# Altium PCB Sampler_DIOT.PCBDOC (part 4 of 11)
Units mm, origin at the board's own origin, x right, y up, seen from the top; angles counter-clockwise.
Board outline 222.9 x 100 mm, 4 copper layers (L1, P2, L3, L4), stack 1.6 mm thick; 754 components, 442 nets, 2347 pads, 1230 vias.
Unrouted connection lines stored in the file: 10.
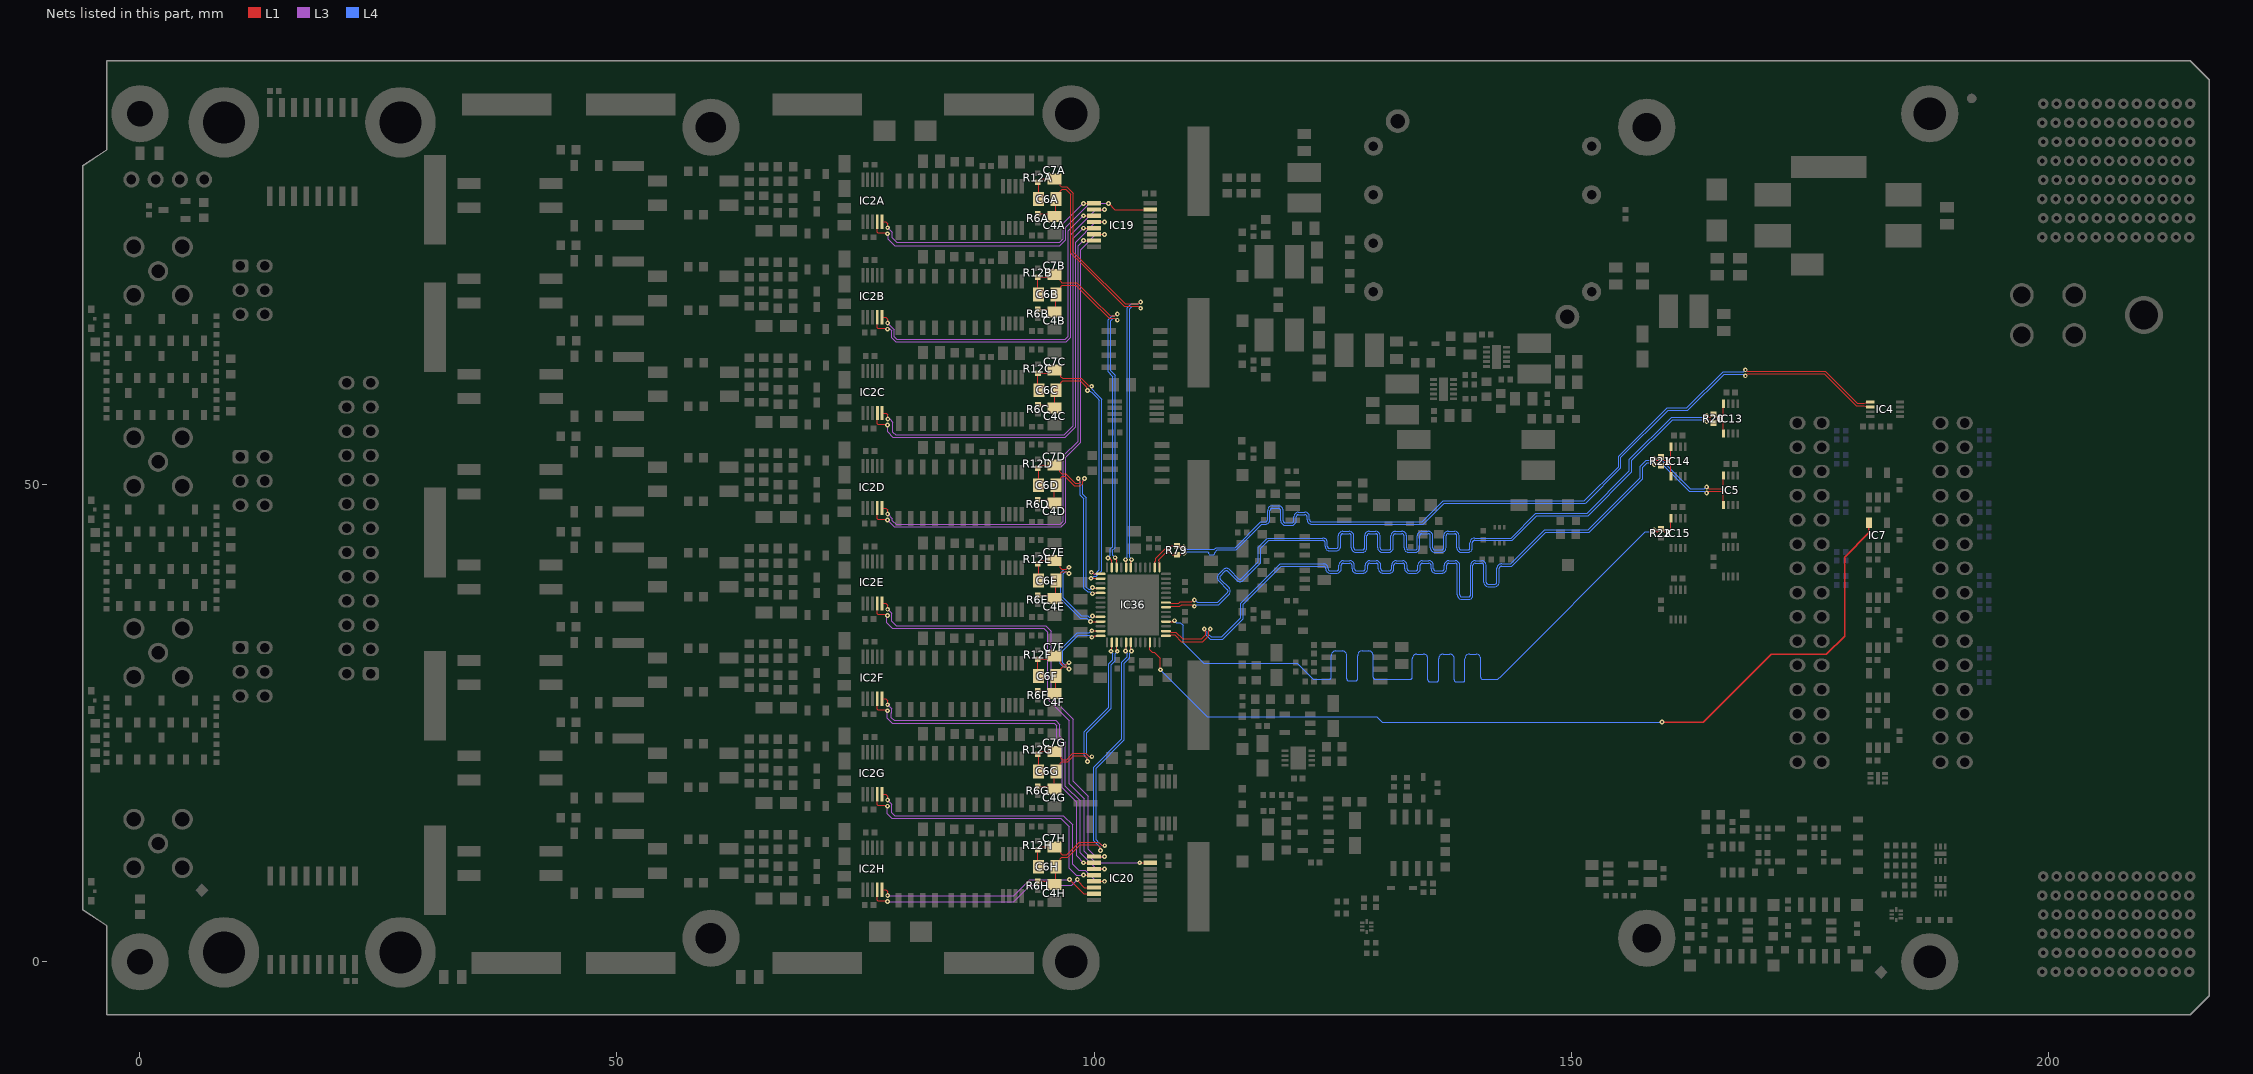
[diagram p5: the nets of this part, all layers, seen from the top]

## Part data (continued)
T_D6: "Schottky Diode", Case=SOD-523F, Manufacturer=COMCHIP, Power=500mA, Voltage=20V, Author="CERN DEM HF", Bonding=No, Component Type=Standard, ComponentHeight=1mm, CreateDate=13.10.2023, Device=CDBU0520-HF, HelpURL=\\cern.ch\dfs\Applications\Altium\Datasheets\CDBU0520-HF.pdf, LatestRevisionDate=13.10.2023, Manufacturer Part Number=CDBU0520-HF, Mounted=Yes, PackageDescription="Small Outline Diode Flat Lead (SOD-523F), Body; 1.80mm L X 1mm W X 0.85mm H", Part Description="20V Surface mount Schottky Barrier Diode", Part Number=CDBU0520-HF, Pin Count=2, PressFit=No, Sense=No, SMD=Yes, Socket=No
T_FL1: library part FIL_MURATA_BNX022-01L, "Block Type EMIFIL (LC Combined)", Manufacturer=MURATA, Manufacturer Part Number=BNX022-01L, Resistance=0.5R, Author="CERN DEM JLC", Component Type=Standard, ComponentHeight=3.3mm, CreateDate=10.10.2012, HelpURL=\\cern.ch\dfs\Applications\Altium\Datasheets\FIL_MURATA_BNX022-01L.pdf, LatestRevisionDate=10.10.2012, Mounted=Yes, Part Description="Block Type EMIFIL (LC Combined) SMD Type, BNX02* Series", Part Number=FIL_MURATA_BNX022-01L, Pin Count=2, Sense=No, SMD=Yes, Socket=No, Status=None
T_IC1: "500mA Peak Output LDO Regulator", Case=SOT23-5, Manufacturer="MICROCHIP TECHNOLOGY", Author="CERN DEM WB", Bonding=No, Component Type=Standard, ComponentHeight=1.45mm, CreateDate=2019-04-16, Device=MIC5219-3.3YM5, HelpURL=\\cern.ch\dfs\Applications\Altium\Datasheets\MIC5219-3.3YM5.pdf, LatestRevisionDate=2019-04-16, Manufacturer Part Number=MIC5219-3.3YM5, Mounted=Yes, PackageDescription="SOT, 0.95mm pitch; 5 pin, 1.60mm W X 2.90mm L X 1.45mm H body, IPC Medium Density", Part Description="3.3V 500mA Peak Output Low Drop-Out  (LDO) Regulator", Part Number=MIC5219-3.3YM5, Pin Count=5, PressFit=No, Sense=No, SMD=Yes, Socket=No
T_IC2 T_IC4: "1.7V-5.5V, 2K I2C Serial EEPROM With EUI-48 Node Identity", Case=SOT23-5, Manufacturer="MICROCHIP TECHNOLOGY", Author="CERN DEM MR", Bonding=No, Component Type=Standard, ComponentHeight=1.45mm, CreateDate=31.03.2016, Device=24AA02E48T-I/OT, HelpURL=\\cern.ch\dfs\Applications\Altium\Datasheets\24AA02E48T-I-OT.pdf, LatestRevisionDate=31.03.2016, Manufacturer Part Number=24AA02E48T-I/OT, Mounted=Yes, PackageDescription="SOT, 0.95mm pitch; 5 pin, 1.60mm W X 2.90mm L X 1.45mm H body, IPC Medium Density", Part Description="1.7V-5.5V, 2K I2C Serial EEPROM with EUI-48 Node Identity", Part Number=24AA02E48T-I/OT, Pin Count=5, PressFit=No, Sense=No, SMD=Yes, Socket=No
T_IC3 T_IC5: "1.7V-5.5V, 2K I2C™ Serial EEPROMs with EUI-48™ Node Identity", Case=SOIC8, Manufacturer="MICROCHIP TECHNOLOGY", Author="CERN DEM MR", Bonding=No, Component Type=Standard, ComponentHeight=1.75mm, CreateDate=19.07.2016, Device=24AA025E48-I/SN, HelpURL=\\cern.ch\dfs\Applications\Altium\Datasheets\24AA025E48-I-SN.pdf, LatestRevisionDate=19.07.2016, Manufacturer Part Number=24AA025E48-I/SN, Mounted=Yes, PackageDescription="SOIC 8, Pitch 1.27mm - Body 4x5mm, IPC Medium Density", Part Description="1.7V-5.5V, 2K I2C™ Serial EEPROMs with EUI-48™ Node Identity", Part Number=24AA025E48-I/SN, Pin Count=8, PressFit=No, Sense=No, SMD=Yes, Socket=No
T_IC6: library part CMP-010-00651-1, "Automotive, ±0.4°C accurate I²C temperature sensor with alert option 6-SOT-5X3 -40 to 125", Manufacturer="Texas Instruments", Manufacturer Part Number=TMP112DQDRLRQ1, Pins=6
T_IC7: "Low Quiescent Current, Programmable-Delay Supervisory Circuit", Case=SOT23-6, Manufacturer="TEXAS INSTRUMENTS", Manufacturer Part Number=TPS3808G01DBV, Author="CERN DEM JLC", Bonding=No, Component Type=Standard, ComponentHeight=1.45mm, CreateDate=22.10.2008, Device=TPS3808G01DBVT, HelpURL=\\cern.ch\dfs\Applications\Altium\Datasheets\TPS3808G01DBVT.pdf, LatestRevisionDate=10.06.2022, Mounted=Yes, PackageDescription="SOT, 0.95mm Pitch; 6 Pin, 1.60mm W X 2.90mm L X 1.45mm H body, IPC Medium Density", Part Description="Adjustable Low Quiescent Current, Programmable-Delay Supervisory Circuit", Part Number=TPS3808G01DBVT, Pin Count=6, PressFit=No, Sense=No, SMD=Yes, Socket=No
T_IC8 T_IC9: library part CMP-015-00014-1, "Dual Supply 2-Bit Voltage Translator/Buffer/Repeater Isolator for I2C Applications", Manufacturer=Onsemi, Max Operating Temperature=85°C, Max Supply Voltage=5.5V, Min Operating Temperature=-40°C, Min Supply Voltage=1.65V, Manufacaturer Part Number=FXMA2102UMX, Mounting Technology="Surface Mount", Pins=8
T_J1 T_J2: library part 3M_N2530-6002RB, "Connector 30 Male", Manufacturer=3M, Manufacturer Part Number=N2530-6002RB, Author="CERN DEM JLC", ComponentHeight=10.03mm, Component Type=Standard, CreateDate=11.02.2009, Family="Header 30", HelpURL=\\cern.ch\dfs\Applications\Altium\Datasheets\3M_N2530-6002RB.pdf, LatestRevisionDate=11.08.2009, Mounted=Yes, Part Description="30 Contacts - Straight .100'' x .100'' Low Profile Four-Wall Header, 2500 Series", Part Number=3M_N2530-6002RB, Pin Count=30, PressFit=No, Sense=No, SMD=No, Socket=No, Status=None
T_J4: library part AMPHENOL_10052825-101LF, "72 Contacts Header, 6 Columns, 4 Pairs per Column", Manufacturer=AMPHENOL, Manufacturer Part Number=10052825-101LF, Author="CERN DEM MR", ClassName=Overlapping, Component Type=Standard, ComponentHeight=15.35mm, ComponentLink1Description=Application, ComponentLink1URL=\\cern.ch\dfs\Applications\Altium\Datasheets\AMPHENOL_10052825-101LF_Application.pdf, CreateDate=19/02/2018, Family="AirMax VS", HelpURL=\\cern.ch\dfs\Applications\Altium\Datasheets\AMPHENOL_10052825-101LF.pdf, LatestRevisionDate=19/02/2018, Mounted=Yes, Part Description="72 Contacts, 2mm Pitch, 6 Columns, 4 Pairs per Column, 4 Walls, Right Angle Header", Part Number=AMPHENOL_10052825-101LF, Pin Count=72, PressFit=Yes, Sense=No, SMD=No, Socket=No, Status=None
T_J5: library part AMPHENOL_10052838-101LF, "96 Contacts Header, 8 Columns, 4 Pairs per Column", Manufacturer=AMPHENOL, Manufacturer Part Number=10052838-101LF, Author="CERN DEM MR", Component Type=Standard, ComponentHeight=15.35mm, ComponentLink1Description=Application, ComponentLink1URL=\\cern.ch\dfs\Applications\Altium\Datasheets\AMPHENOL_10052838-101LF_Application.pdf, CreateDate=19.02.2018, Family="AirMax VS", HelpURL=\\cern.ch\dfs\Applications\Altium\Datasheets\AMPHENOL_10052838-101LF.pdf, LatestRevisionDate=19.02.2018, Mounted=Yes, Part Description="96 Contacts, 2mm Pitch, 8 Columns, 4 Pairs per Column, 4 Walls, Right Angle Header", Part Number=AMPHENOL_10052838-101LF, Pin Count=96, PressFit=Yes, Sense=No, SMD=No, Socket=No, Status=None
T_J6: library part MOLEX_39-30-0040, "Connector 4 Male", Manufacturer=MOLEX, Manufacturer Part Number=39-30-0040, Author="CERN DEM JLC", Component Type=Standard, ComponentHeight=11.4mm, CreateDate=2018-10-02, Family="Mini-Fit Jr.™", HelpURL=\\cern.ch\dfs\Applications\Altium\Datasheets\MOLEX_39-30-0040.pdf, LatestRevisionDate=2018-10-02, Mounted=Yes, Part Description="4.20mm (.165\") Pitch Mini-Fit Jr. Header, Dual Row, Right Angle with Snap-in Plastic Peg PCB Lock, 4 Circuits", Part Number=MOLEX_39-30-0040, Pin Count=4, PressFit=No, Sense=No, SMD=No, Socket=No, Status=None
T_M1 T_M2 T_M3 T_M4: library part CMP-00028-00019-2, "PTH  Hole 3.4, 6mm pad", Pins=1
T_R13 T_R14 T_R15 T_R16 T_R17 T_R18: library part R0402_22R_1%_0.0625W_100PPM, "Resistor - 1%", Case=0402, Manufacturer=GENERIC, Manufacturer1 ComponentHeight=0.4mm, Manufacturer1 Example="YAGEO PHYCOMP", Manufacturer1 Part Number=232270672209L, Power=0.0625W, Tolerance=±1%, Author="CERN DEM JLC", Component Type=Standard, CreateDate=03.12.2007, HelpURL=\\cern.ch\dfs\Applications\Altium\Datasheets\R0402_Phycomp_RC0402.pdf, LatestRevisionDate=17.10.2012, Manufacturer Part Number=R0402_22R_1%_0.0625W_100PPM, Mounted=Yes, Part Description="General Purpose Thick Film Chip Resistor", Part Number=R0402_22R_1%_0.0625W_100PPM, Pin Count=2, PressFit=No, Sense=No, SMD=Yes, Socket=No, Status="Not Recommended"
T_R19: library part R0402_200R_1%_0.0625W_100PPM, "Resistor - 1%", Case=0402, Manufacturer=GENERIC, Manufacturer1 ComponentHeight=0.4mm, Manufacturer1 Example="YAGEO PHYCOMP", Manufacturer1 Part Number=232270672001L, Power=0.0625W, Tolerance=±1%, Author="CERN DEM JLC", Component Type=Standard, CreateDate=2007-12-03, HelpURL=\\cern.ch\dfs\Applications\Altium\Datasheets\R0402_Phycomp_RC0402.pdf, LatestRevisionDate=2012-10-17, Manufacturer Part Number=R0402_200R_1%_0.0625W_100PPM, Mounted=Yes, Part Description="General Purpose Thick Film Chip Resistor", Part Number=R0402_200R_1%_0.0625W_100PPM, Pin Count=2, PressFit=No, Sense=No, SMD=Yes, Socket=No, Status="Not Recommended", TC=±100ppm/°C
T_R26: library part R0805_1M1_1%_0.125W_100PPM, "Resistor - 1%", Case=0805, Manufacturer=GENERIC, Manufacturer1 ComponentHeight=0.6mm, Manufacturer1 Example="NIC COMPONENT", Manufacturer1 Part Number=NRC10F1104TRF, Author="CERN DEM JLC", Component Type=Standard, CreateDate=03/12/2007, HelpURL=\\cern.ch\dfs\Applications\Altium\Datasheets\R0805_NIC_NRC.pdf, LatestRevisionDate=13/03/2008, Manufacturer Part Number=R0805_1M1_1%_0.125W_100PPM, Mounted=Yes, Part Description="General Purpose Thick Film Chip Resistor", Part Number=R0805_1M1_1%_0.125W_100PPM, Pin Count=2, PressFit=No, Sense=No, SMD=Yes, Socket=No, Status=Preferred
T_R27 T_R28: library part "R0805_10M_1%_0.125W_100PPM_VISHAY_CRCW e3", "Resistor - 1%", Case=0805, Manufacturer="VISHAY DALE", Manufacturer Part Number=CRCW080510M0FKEA, Power=0.125W, Tolerance=±1%, Author="CERN DEM BC", Component Type=Standard, ComponentHeight=0.5mm, CreateDate=2019-11-12, HelpURL="\\cern.ch\dfs\Applications\Altium\Datasheets\R0805_VISHAY_CRCW e3.pdf", LatestRevisionDate=2019-11-12, Mounted=Yes, Part Description="150V, Standard Thick Film Chip Resistor", Part Number="R0805_10M_1%_0.125W_100PPM_VISHAY_CRCW e3", Pin Count=2, PressFit=No, Sense=No, SMD=Yes, Socket=No, Status=None, TC=±100ppm/°C
TP1 TP2 TP3 TP4 TP5 TP6 TP7 TP8 TP9 TP10 TP11 TP12 TP13 TP14 TP15 TP16 TP17 TP18 TP19 TP20: library part SMD_PAD_1.27X1.27MM, Author="CERN DEM JLC", ComponentHeight=0mm, Component Type="Standard (No BOM)", CreateDate=12.01.2008, Family="Test Point", HelpURL=Undefined, LatestRevisionDate=12.01.2008, Mounted=No, PackageDescription="1.27mm x 1.27mm PCB Copper Area (SMD Test Point)", Part Description="1.27mm x 1.27mm PCB Copper Area (SMD Test Point)", Part Number=SMD_PAD_1.27X1.27MM, Pin Count=1, Sense=No, SMD=Yes, Socket=No, Status=None
WASHER5 WASHER6 WASHER7 WASHER8: library part Keystone_7687, "SMA_Shoulder Washer", Author=GK, Component Type=Mechanical, ComponentHeight=1.91mm, CreateDate=28.01.2016, HelpURL=\\cern.ch\dfs\Applications\Altium\Datasheets\AAVID-THERMALLOY_7721-7PPSG.pdf, LatestRevisionDate=28.01.2016, Manufacturer="Custom 3D printed", Manufacturer Part Number="Custom 3D printed", Mounted=Yes, PackageDescription="Polyphenylene Sulfide PPS Shoulder Washer", Part Description="Polyphenylene Sulfide PPS Shoulder Washer", Part Number="Custom 3D printed", Pin Count=0, PressFit=No, Sense=No, SMD=No, Socket=No, Status=None

## Free pads (board coordinates)
  round 6 / inner round 4.5 / far side round 6 hole 3.2: MH(59.844,2.48) MH(59.844,87.48)

## Via types
v1: diameter 0.5, hole 0.2, L1 to L4, tented both sides, 1208 vias
v2: diameter 1, hole 0.6, L1 to L4, tented both sides, 16 vias
v3: diameter 0.6, hole 0.3, L1 to L4, tented both sides, 6 vias

## Nets (pads, with @x,y where several pads share a name; then routed paths per layer and width w, separated by ;. In a path a pad name is that pad's centre, name@x,y a point inside that pad or via, vN(x,y) a via of type N, cw(c..) or ccw(c..) an arc to the next point about the centre after c; other vN are vias at no path point)
A00: IC2A.4 IC19.15 | length 33.7
  L1 w0.127: IC2A.4@77.275,77.567 77.275,76.458 77.325,76.408 78.254,76.408 v1(78.35,76.312) ; v1(101.525,79.5) 102.175,78.85 IC19.15@105.899,78.85
  L3 w0.127: v1(78.35,76.312) 78.434,76.397 78.434,75.73 79.118,75.045 96.393,75.045 97.044,75.697 97.044,76.993 99.55,79.5 v1(101.525,79.5)
A01: IC2B.4 IC19.2 | length 39.2
  L1 w0.127: IC2B.4@77.275,67.567 77.275,66.458 77.325,66.408 78.254,66.408 v1(78.35,66.312) ; IC19.2@99.999,78.85 v1(101.101,78.85)
  L3 w0.127: v1(78.35,66.312) 78.434,66.397 78.543,66.397 78.815,66.125 78.815,65.425 79.239,65.001 97.099,65.001 97.573,65.475 97.573,76.232 100.191,78.85 v1(101.101,78.85)
A02: IC2C.4 IC19.4 | length 47.8
  L1 w0.127: IC2C.4@77.288,57.523 77.288,56.414 77.338,56.364 78.267,56.364 v1(78.363,56.269) ; IC19.4@99.999,77.55 v1(101.101,77.55)
  L3 w0.127: v1@78.447,56.353 v1(78.363,56.269) 78.363,55.536 78.898,55.001 96.986,55.001 98.081,56.096 98.081,75.431 100.2,77.55 v1(101.101,77.55)
A03: IC2D.4 IC19.6 | length 54.9
  L1 w0.127: IC2D.4@77.275,47.567 77.275,46.458 77.325,46.408 78.254,46.408 v1(78.35,46.312) ; IC19.6@99.999,76.25 v1(101.101,76.25)
  L3 w0.127: v1(78.35,46.312) 79.076,45.586 96.551,45.586 97.048,46.084 97.048,52.897 98.589,54.438 98.589,74.634 100.205,76.25 v1(101.101,76.25)
A04: IC2E.4 IC20.15 | length 52.4
  L1 w0.127: IC2E.4@77.275,37.567 77.275,36.458 77.325,36.408 78.254,36.408 v1(78.35,36.312) ; v1(104.797,10.387) IC20.15@105.899,10.387
  L3 w0.127: v1@78.434,36.397 v1(78.35,36.312) 78.294,36.256 78.294,35.559 78.873,34.98 94.723,34.98 95.143,34.56 95.143,27.529 97.412,25.26 97.412,18.663 98.975,17.1 98.975,11.6 100.188,10.387 v1(104.797,10.387)
A05: IC2F.4 IC20.2 | length 37.8
  L1 w0.127: IC2F.4@77.275,27.567 77.275,26.458 77.325,26.408 78.254,26.408 v1(78.35,26.312) ; v1(98.897,10.387) IC20.2@99.999,10.387
  L3 w0.127: v1@78.434,26.397 v1(78.35,26.312) 78.35,25.524 78.869,25.005 95.845,25.005 96.096,24.754 96.096,23.441 96.666,22.871 96.666,18.247 98.187,16.725 98.187,11.096 v1(98.897,10.387)
A06: IC2G.4 IC20.4 | length 30
  L1 w0.127: IC2G.4@77.275,17.567 77.275,16.458 77.325,16.408 78.254,16.408 v1(78.35,16.312) ; v1(98.897,9.087) IC20.4@99.999,9.087
  L3 w0.127: v1@78.434,16.397 v1(78.35,16.312) 78.35,15.499 78.778,15.071 96.498,15.071 97.425,14.144 97.425,9.825 98.163,9.087 v1(98.897,9.087)
A07: IC2H.4 IC20.6 | length 25.3
  L1 w0.127: IC2H.4@77.275,7.567 77.275,6.458 77.325,6.408 78.254,6.408 v1(78.35,6.312) ; v1(98.25,8.625) 98.25,8.528 98.991,7.787 IC20.6@99.999,7.787
  L3 w0.127: v1(78.35,6.312) 91.612,6.312 93.325,8.025 97.651,8.025 v1(98.25,8.625)
A10: IC2A.5 IC19.1 | length 26.3
  L1 w0.127: IC2A.5@77.775,77.567 78.188,77.567 78.375,77.379 v1(78.375,76.947) ; v1(98.897,79.5) IC19.1@99.999,79.5
  L3 w0.127: v1(78.375,76.947) 78.834,76.489 78.834,75.91 79.337,75.407 96.395,75.407 96.79,75.802 96.79,77.393 v1(98.897,79.5)
A11: IC2B.5 IC19.3 | length 35.7
  L1 w0.127: IC2B.5@77.775,67.567 78.188,67.567 78.375,67.379 v1(78.375,66.947) ; v1(98.897,78.2) IC19.3@99.999,78.2
  L3 w0.127: v1(78.375,66.947) 79.069,66.254 79.069,65.53 79.344,65.255 96.994,65.255 97.319,65.58 97.319,76.622 v1(98.897,78.2)
A12: IC2C.5 IC19.5 | length 44.5
  L1 w0.127: IC2C.5@77.788,57.523 78.2,57.523 78.388,57.335 v1(78.388,56.904) ; v1(98.897,76.9) IC19.5@99.999,76.9
  L3 w0.127: v1(78.388,56.904) 78.595,56.904 78.919,56.58 78.919,55.53 79.194,55.255 96.869,55.255 97.827,56.213 97.827,75.83 v1(98.897,76.9)
A13: IC2D.5 IC19.7 | length 51.6
  L1 w0.127: IC2D.5@77.775,47.567 78.188,47.567 78.375,47.379 v1(78.375,46.947) ; v1(98.897,75.6) IC19.7@99.999,75.6
  L3 w0.127: v1(78.375,46.947) 78.869,46.454 78.869,46.231 79.26,45.84 96.446,45.84 96.794,46.189 96.794,53.048 98.335,54.589 98.335,75.038 v1(98.897,75.6)
A14: IC2E.5 IC20.1 | length 47.2
  L1 w0.127: IC2E.5@77.775,37.567 78.188,37.567 78.375,37.379 v1(78.375,36.947) ; IC20.1@99.999,11.037 v1(101.101,11.037)
  L3 w0.127: v1(78.375,36.947) 78.791,36.532 78.791,35.709 79.266,35.234 94.937,35.234 95.524,34.647 95.524,27.748 97.837,25.435 97.837,18.913 99.4,17.35 99.4,11.825 100.188,11.037 v1(101.101,11.037)
A15: IC2F.5 IC20.3 | length 39.3
  L1 w0.127: IC2F.5@77.775,27.567 78.188,27.567 78.375,27.379 v1(78.375,26.947) ; IC20.3@99.999,9.737 v1(101.101,9.737)
  L3 w0.127: v1(78.375,26.947) 78.791,26.532 78.791,26.13 78.744,26.083 78.744,25.605 79.044,25.305 95.969,25.305 96.4,24.874 96.4,24.122 96.4,24.025 96.4,23.623 97.01,23.013 97.01,18.403 98.533,16.88 98.533,11.425 100.222,9.737 v1(101.101,9.737)
A16: IC2G.5 IC20.5 | length 31.4
  L1 w0.127: IC2G.5@77.775,17.567 78.188,17.567 78.375,17.379 v1(78.375,16.947) ; IC20.5@99.999,8.437 v1(101.101,8.437)
  L3 w0.127: v1(78.375,16.947) 78.791,16.532 78.791,15.634 79.099,15.325 96.8,15.325 97.775,14.35 97.775,10.213 98.413,9.575 99.075,9.575 100.213,8.437 v1(101.101,8.437)
A17: IC2H.5 IC20.7 | length 24.1
  L1 w0.127: IC2H.5@77.775,7.567 78.188,7.567 78.375,7.379 v1(78.375,6.947) ; v1(97.437,8.62) 97.441,8.62 98.925,7.137 IC20.7@99.999,7.137
  L3 w0.127: v1(78.375,6.947) 91.572,6.947 93.245,8.62 v1(97.437,8.62) v1@97.508,8.549
ADC_CLKOUT_N: IC13.8 IC36.34 R20.2 | length 91.6
  L1 w0.127: IC36.34@107.539,37.665 107.965,37.665 108.063,37.568 108.866,37.568 109.046,37.748 110.256,37.748 110.43,37.921 v1(110.519,37.921) ; v1(164.222,57.262) 164.413,57.071 164.585,57.071 R20.2@164.928,57.414 ; R20.2@164.948,57.414 165.174,57.188 165.174,57.145 165.248,57.071 165.844,57.071 165.978,57.205 IC13.8@165.978,58.494
  L4 w0.127: v1(110.519,37.921) 110.608,37.921 110.83,37.7 111.225,37.7 112.425,37.7 112.982,37.7 113.848,38.566 113.983,38.701 ccw(c113.824,38.86) 113.982,39.02 113.062,39.94 cw(c113.401,40.279) 113.062,40.618 113.541,41.096 cw(c113.88,40.757) 114.219,41.096 115.139,40.176 ccw(c115.298,40.335) 115.458,40.176 115.995,40.713 117.221,41.939 117.221,43.444 118.122,44.346 118.197,44.42 121.484,44.42 123.991,44.42 cw(c123.991,43.941) 124.471,43.941 124.471,43.555 ccw(c124.696,43.555) 124.696,43.33 125.372,43.33 ccw(c125.372,43.555) 125.598,43.555 125.598,44.645 cw(c126.077,44.645) 126.077,45.124 126.753,45.124 cw(c126.753,44.645) 127.233,44.645 127.233,43.398 ccw(c127.458,43.398) 127.458,43.173 128.134,43.173 ccw(c128.134,43.398) 128.36,43.398 128.36,44.645 cw(c128.839,44.645) 128.839,45.124 129.515,45.124 cw(c129.515,44.645) 129.995,44.645 129.995,43.398 ccw(c130.22,43.398) 130.22,43.173 130.896,43.173 ccw(c130.896,43.398) 131.122,43.398 131.122,44.645 cw(c131.601,44.645) 131.601,45.124 132.277,45.124 cw(c132.277,44.645) 132.757,44.645 132.757,43.398 ccw(c132.982,43.398) 132.982,43.173 133.658,43.173 ccw(c133.658,43.398) 133.884,43.398 133.884,44.645 cw(c134.363,44.645) 134.363,45.124 135.039,45.124 cw(c135.039,44.645) 135.519,44.645 135.519,43.398 ccw(c135.744,43.398) 135.744,43.173 136.42,43.173 ccw(c136.42,43.398) 136.646,43.398 136.646,44.645 cw(c137.125,44.645) 137.125,45.124 137.801,45.124 cw(c137.801,44.645) 138.281,44.645 138.281,43.398 ccw(c138.506,43.398) 138.506,43.173 139.182,43.173 ccw(c139.182,43.398) 139.408,43.398 139.408,43.941 cw(c139.887,43.941) 139.887,44.42 140.078,44.42 143.711,44.42 146.31,47.019 151.685,47.019 156.125,51.459 156.125,52.664 160.533,57.073 163.957,57.073 164.146,57.262 v1(164.222,57.262)
ADC_CLKOUT_P: IC13.1 IC36.33 R20.1 | length 91.6
  L1 w0.127: IC36.33@107.539,37.165 107.965,37.165 108.063,37.263 108.992,37.263 109.172,37.443 110.256,37.443 110.43,37.269 v1(110.519,37.269) ; v1(164.222,56.635) 164.404,56.817 164.585,56.817 R20.1@164.928,56.474 ; R20.1@164.948,56.474 165.174,56.701 165.174,56.743 165.248,56.817 165.84,56.817 165.978,56.679 IC13.1@165.978,55.394
  L4 w0.127: v1(110.519,37.269) 110.608,37.269 110.785,37.446 113.087,37.446 114.028,38.386 114.163,38.521 ccw(c113.824,38.86) 114.2,39.157 114.2,39.162 114.163,39.198 ; 114.163,39.199 113.242,40.12 cw(c113.401,40.279) 113.242,40.438 113.72,40.917 cw(c113.88,40.757) 114.039,40.917 114.959,39.996 ccw(c115.298,40.335) 115.637,39.996 116.175,40.533 117.475,41.834 117.475,43.339 118.302,44.166 121.484,44.166 123.991,44.166 cw(c123.991,43.941) 124.217,43.941 124.217,43.555 ccw(c124.696,43.555) 124.696,43.076 125.372,43.076 ccw(c125.372,43.555) 125.852,43.555 125.852,44.645 cw(c126.077,44.645) 126.077,44.87 126.753,44.87 cw(c126.753,44.645) 126.979,44.645 126.979,43.398 ccw(c127.458,43.398) 127.458,42.919 128.134,42.919 ccw(c128.134,43.398) 128.614,43.398 128.614,44.645 cw(c128.839,44.645) 128.839,44.87 129.515,44.87 cw(c129.515,44.645) 129.741,44.645 129.741,43.398 ccw(c130.22,43.398) 130.22,42.919 130.896,42.919 ccw(c130.896,43.398) 131.376,43.398 131.376,44.645 cw(c131.601,44.645) 131.601,44.87 132.277,44.87 cw(c132.277,44.645) 132.503,44.645 132.503,43.398 ccw(c132.982,43.398) 132.982,42.919 133.658,42.919 ccw(c133.658,43.398) 134.138,43.398 134.138,44.645 cw(c134.363,44.645) 134.363,44.87 135.039,44.87 cw(c135.039,44.645) 135.265,44.645 135.265,43.398 ccw(c135.744,43.398) 135.744,42.919 136.42,42.919 ccw(c136.42,43.398) 136.9,43.398 136.9,44.645 cw(c137.125,44.645) 137.125,44.87 137.801,44.87 cw(c137.801,44.645) 138.027,44.645 138.027,43.398 ccw(c138.506,43.398) 138.506,42.919 139.182,42.919 ccw(c139.182,43.398) 139.662,43.398 139.662,43.941 cw(c139.887,43.941) 139.887,44.166 140.078,44.166 143.816,44.166 146.415,46.765 151.79,46.765 156.379,51.354 156.379,52.559 160.639,56.819 163.961,56.819 164.146,56.635 v1(164.222,56.635)
ADC_CNV: IC7.5 IC36.24 | length 94.1
  L1 w0.127: IC36.24@105.864,33.49 105.864,32.702 106.097,32.469 106.313,32.469 106.96,31.822 v1(106.96,30.612)
  L1 w0.152: v1(159.525,25.125) 163.871,25.125 170.995,32.249 176.776,32.249 178.673,34.147 178.673,42.408 181.227,44.962 IC7.5@181.227,46.02
  L4 w0.127: v1(106.96,30.612) 111.882,25.69 129.661,25.69 130.225,25.125 v1(159.525,25.125)
ADC_IN_N0: C4A.2 C6A.2 IC36.47 R6A.2 | length 50.6
  L1 w0.127: R6A.2@94.103,78.426 95.533,78.426 C4A.2@95.853,78.106 96.003,78.256 C6A.2@96.003,79.956 96.481,80.434 96.481,80.794 96.655,80.967 97.058,80.967 97.25,80.775 97.575,80.45 97.575,74.291 98.695,73.17 103.16,68.705 104.633,68.705 104.832,68.506 v1(104.894,68.506) ; IC36.47@103.864,41.34 103.864,42.079 v1(103.94,42.155)
  L4 w0.127: v1(103.94,42.155) 103.94,42.217 103.741,42.416 103.741,68.451 103.996,68.705 104.695,68.705 v1(104.894,68.506)
ADC_IN_N1: C4B.2 C6B.2 IC36.50 R6B.2 | length 39.5
  L1 w0.127: R6B.2@94.103,68.426 95.533,68.426 C4B.2@95.853,68.106 96.003,68.256 C6B.2@96.003,69.956 96.507,70.46 96.507,70.768 96.682,70.943 98.107,70.943 99.525,69.525 101.595,67.455 102.183,67.455 102.382,67.256 v1(102.444,67.256) ; v1(102.219,42.365) 102.219,42.224 102.364,42.079 IC36.50@102.364,41.34
  L4 w0.127: v1(102.219,42.365) 102.219,42.378 101.971,42.626 101.971,43.178 102.204,43.411 102.204,61.496 101.875,61.825 101.767,61.933 101.767,67.216 102.006,67.455 102.183,67.455 102.382,67.256 v1(102.444,67.256)
ADC_IN_N2: C4C.2 C6C.2 IC36.1 R6C.2 | length 29.9
  L1 w0.127: R6C.2@94.116,58.382 95.546,58.382 C4C.2@95.866,58.062 95.866,59.762 C6C.2@96.016,59.912 96.527,60.424 96.527,60.717 96.702,60.892 98.569,60.892 99.243,60.218 99.243,59.955 v1(99.314,59.883) ; v1(99.717,40.829) 99.818,40.829 99.958,40.689 100.665,40.689 IC36.1@100.689,40.665
  L4 w0.127: v1(99.314,59.883) 99.367,59.831 99.63,59.831 99.829,59.632 99.918,59.543 100.28,59.18 100.575,58.886 100.575,41.08 100.138,40.643 100,40.643 99.814,40.829 v1(99.717,40.829)
ADC_IN_N3: C4D.2 C6D.2 IC36.4 R6D.2 | length 21.6
  L1 w0.127: R6D.2@94.103,48.426 95.533,48.426 C4D.2@95.853,48.106 95.853,49.806 C6D.2@96.003,49.956 96.514,50.467 96.514,50.761 96.661,50.907 96.926,50.907 97.779,50.054 97.928,49.906 98.583,49.906 98.806,50.129 98.806,50.397 99.005,50.596 v1(99.005,50.658) ; v1(99.844,39.242) 99.92,39.165 IC36.4@100.689,39.165
  L4 w0.127: v1(99.005,50.658) 99.005,50.596 98.806,50.397 98.806,49.003 99.181,48.628 99.181,39.286 99.425,39.042 99.583,39.042 99.782,39.242 v1(99.844,39.242)
ADC_IN_N4: C4E.2 C6E.2 IC36.10 R6E.2 | length 14
  L1 w0.127: R6E.2@94.103,38.426 95.533,38.426 C4E.2@95.853,38.106 96.003,38.256 C6E.2@96.003,39.956 96.515,40.468 96.515,40.819 96.601,40.905 97.108,40.905 97.307,40.706 v1(97.369,40.706) ; v1(99.846,36.257) 99.914,36.189 100.665,36.189 IC36.10@100.689,36.165
  L4 w0.127: v1(97.369,40.706) 97.307,40.706 97.108,40.905 96.965,40.905 96.75,40.69 96.75,38.157 98.642,36.265 99.324,36.265 99.48,36.109 99.597,36.109 99.753,36.265 v1@99.838,36.265
ADC_IN_N5: C4F.2 C6F.2 IC36.13 R6F.2 | length 13.4
  L1 w0.127: R6F.2@94.103,28.426 95.533,28.426 C4F.2@95.853,28.106 96.003,28.256 C6F.2@96.003,29.956 96.515,30.468 96.515,30.703 96.717,30.905 97.108,30.905 97.307,30.706 v1(97.369,30.706) ; v1(99.77,34.697) 99.787,34.681 100.673,34.681 IC36.13@100.689,34.665
  L4 w0.127: v1(97.369,30.706) 97.307,30.706 97.108,30.905 96.803,30.905 96.729,30.98 96.471,31.238 96.471,32.73 98.225,34.485 99.51,34.485 99.722,34.697 v1(99.77,34.697)
ADC_IN_N6: C4G.2 C6G.2 IC36.16 R6G.2 | length 22.4
  L1 w0.127: R6G.2@94.103,18.426 95.533,18.426 C4G.2@95.853,18.106 95.853,19.806 C6G.2@96.003,19.956 96.484,20.437 96.484,20.791 96.64,20.948 97.237,20.948 97.89,21.6 99.021,21.6 99.286,21.334 99.286,21.039 v1(99.323,21.002) ; v1(101.788,32.555) 101.864,32.631 IC36.16@101.864,33.49
  L4 w0.127: v1(99.323,21.002) 99.286,21.039 99.286,21.334 99.104,21.517 98.971,21.65 98.971,24.096 101.571,26.696 101.571,31.246 101.987,31.662 101.987,32.294 101.788,32.493 v1(101.788,32.555)
ADC_IN_N7: C4H.2 C6H.2 IC36.19 R6H.2 | length 33.3
  L1 w0.127: R6H.2@94.103,8.426 95.533,8.426 C4H.2@95.853,8.106 96.003,8.256 C6H.2@96.003,9.956 C6H.2@96.003,10.164 ; C6H.2@96.484,10.437 96.484,10.791 96.64,10.948 97.237,10.948 98.579,12.29 100.359,12.29 100.64,12.008 100.64,11.712 v1(100.677,11.676) ; v1(103.288,32.58) 103.364,32.656 IC36.19@103.364,33.49
  L4 w0.127: v1(100.677,11.676) 100.64,11.712 100.64,12.008 100.287,12.362 99.959,12.69 99.959,20.409 102.907,23.357 102.907,31.38 103.487,31.96 103.487,32.319 103.288,32.518 v1(103.288,32.58)
ADC_IN_P0: C6A.1 C7A.1 IC36.48 R12A.2 | length 50.9
  L1 w0.127: C6A.1@94.203,79.956 94.203,81.636 R12A.2@94.103,81.736 94.423,82.056 C7A.1@95.853,82.056 95.973,82.056 96.485,81.545 96.485,81.372 96.636,81.221 97.163,81.221 97.17,81.214 97.829,80.555 97.829,80.381 97.829,74.396 98.621,73.604 98.875,73.35 103.266,68.959 104.633,68.959 104.832,69.159 v1(104.894,69.159) ; v1(103.288,42.155) 103.364,42.079 IC36.48@103.364,41.34
  L4 w0.127: v1(103.288,42.155) 103.288,42.217 103.487,42.416 103.487,68.556 103.891,68.959 104.695,68.959 v1@104.894,69.158
ADC_IN_P1: C6B.1 C7B.1 IC36.51 R12B.2 | length 40.1
  L1 w0.127: C6B.1@94.203,69.956 94.103,70.056 R12B.2@94.103,71.736 95.375,71.736 95.695,72.056 C7B.1@95.853,72.056 95.964,72.056 96.475,71.545 96.475,71.365 96.643,71.197 98.212,71.197 99.884,69.525 101.7,67.709 102.183,67.709 102.382,67.909 v1(102.444,67.909) ; v1(101.469,42.33) 101.613,42.33 101.74,42.202 101.74,42.167 101.864,42.044 IC36.51@101.864,41.34
  L4 w0.127: v1(101.469,42.33) 101.469,42.343 101.717,42.591 101.717,43.283 101.95,43.516 101.95,61.317 101.695,61.572 101.695,61.645 101.513,61.828 101.513,67.321 101.901,67.709 102.183,67.709 102.382,67.909 v1(102.444,67.909)
ADC_IN_P2: C6C.1 C7C.1 IC36.2 R12C.2 | length 30.7
  L1 w0.127: C6C.1@94.216,59.912 94.116,60.012 R12C.2@94.116,61.692 95.546,61.692 C7C.1@95.866,62.012 95.996,62.012 96.507,61.501 96.507,61.338 96.7,61.146 98.674,61.146 99.348,60.473 99.422,60.398 99.686,60.398 v1(99.757,60.327) ; v1(99.671,40.203) 99.69,40.184 100.67,40.184 IC36.2@100.689,40.165
  L4 w0.127: v1(99.671,40.203) 99.772,40.203 99.958,40.389 100.243,40.389 100.829,40.975 100.829,55.395 ; v1(99.757,60.327) 99.81,60.274 99.81,60.01 99.934,59.886 100.098,59.723 100.829,58.991 100.829,55.4
ADC_IN_P3: C6D.1 C7D.1 IC36.5 R12D.2 | length 21.6
  L1 w0.127: C6D.1@94.203,49.956 94.203,51.636 R12D.2@94.103,51.736 94.423,52.056 C7D.1@95.853,52.056 95.918,52.056 96.43,51.545 96.43,51.365 96.633,51.161 97.031,51.161 98.033,50.16 98.478,50.16 98.552,50.234 98.552,50.397 98.353,50.596 v1(98.353,50.658) ; v1(99.844,38.589) 99.92,38.665 IC36.5@100.689,38.665
  L4 w0.127: v1(98.353,50.658) 98.353,50.596 98.552,50.397 98.552,48.898 98.927,48.523 98.927,39.181 99.32,38.788 99.583,38.788 99.782,38.589 v1(99.844,38.589)
ADC_IN_P4: C6E.1 C7E.1 IC36.11 R12E.2 | length 14.9
  L1 w0.127: C6E.1@94.203,39.956 94.203,41.636 R12E.2@94.103,41.736 94.423,42.056 C7E.1@95.853,42.056 95.973,42.056 96.484,41.545 96.484,41.293 96.618,41.159 97.108,41.159 97.307,41.359 v1(97.369,41.359) ; v1(99.639,35.665) IC36.11@100.689,35.665
  L4 w0.127: v1(97.369,41.359) 97.307,41.359 97.108,41.159 96.86,41.159 96.496,40.795 96.496,38.052 98.537,36.011 99.219,36.011 99.565,35.665 v1(99.639,35.665)
ADC_IN_P5: C6F.1 C7F.1 IC36.14 R12F.2 | length 12.6
  L1 w0.127: C6F.1@94.203,29.956 94.103,30.056 R12F.2@94.103,31.736 95.533,31.736 C7F.1@95.853,32.056 96.003,32.056 96.515,31.545 96.515,31.353 96.709,31.159 97.108,31.159 97.307,31.359 v1(97.369,31.359) ; v1@99.817,34.049 99.857,34.089 100.03,34.089 100.102,34.161 100.684,34.161 IC36.14@100.689,34.165
  L4 w0.127: v1(97.369,31.359) 97.307,31.359 97.108,31.159 96.908,31.159 96.725,31.343 96.725,32.625 98.331,34.231 99.51,34.231 99.722,34.018 v1(99.77,34.018)
ADC_IN_P6: C6G.1 C7G.1 IC36.17 R12G.2 | length 22.2
  L1 w0.127: C6G.1@94.203,19.956 94.203,21.636 R12G.2@94.103,21.736 94.423,22.056 C7G.1@95.853,22.056 95.991,22.056 96.503,21.545 96.503,21.39 96.691,21.202 97.132,21.202 97.784,21.854 99.126,21.854 99.441,21.539 99.736,21.539 v1(99.773,21.502) ; IC36.17@102.364,33.49 102.364,32.631 v1(102.44,32.555)
  L4 w0.127: v1(99.773,21.502) 99.736,21.539 99.441,21.539 99.225,21.755 99.225,23.991 101.825,26.591 101.825,31.141 102.241,31.557 102.241,32.294 102.44,32.493 v1(102.44,32.555)
ADC_IN_P7: C6H.1 C7H.1 IC36.20 R12H.2 | length 33
  L1 w0.127: C6H.1@94.203,9.956 94.103,10.056 R12H.2@94.103,11.736 94.423,12.056 C7H.1@95.853,12.056 95.929,11.98 C7H.1@96.144,11.98 ; C7H.1@96.503,11.545 96.503,11.39 96.691,11.202 97.132,11.202 98.474,12.544 100.464,12.544 100.538,12.469 100.795,12.212 101.091,12.212 v1(101.127,12.176) ; IC36.20@103.864,33.49 103.864,32.656 v1(103.94,32.58)
  L4 w0.127: v1(101.127,12.176) 101.091,12.212 100.795,12.212 100.466,12.541 100.213,12.795 100.213,20.303 103.161,23.252 103.161,31.275 103.741,31.855 103.741,32.319 103.94,32.518 v1(103.94,32.58)
ADC_SCK_N: IC4.5 IC36.42 R79.1 | length 90.9
  L1 w0.127: IC36.42@106.364,41.34 106.364,41.942 106.462,42.039 106.462,42.288 107.482,43.308 107.833,43.308 108.125,43.6 R79.1@108.694,43.6 109.08,43.6 109.211,43.469 v1(109.417,43.469) ; v1(168.275,62.052) 168.448,61.879 176.643,61.879 179.981,58.542 180.756,58.542 180.828,58.613 181.316,58.613 IC4.5@181.367,58.664
  L4 w0.127: v1(109.417,43.469) 109.479,43.469 109.719,43.229 112.62,43.229 112.818,43.427 114.781,43.427 117.477,46.123 117.775,46.123 117.966,46.123 ccw(c117.966,46.348) 118.191,46.348 118.191,47.301 cw(c118.67,47.301) 118.67,47.781 119.347,47.781 cw(c119.347,47.301) 119.826,47.301 119.826,46.238 ccw(c120.051,46.238) 120.051,46.013 120.728,46.013 ccw(c120.728,46.238) 120.953,46.238 120.953,46.648 cw(c121.432,46.648) 121.432,47.127 122.109,47.127 cw(c122.109,46.648) 122.588,46.648 122.588,46.348 ccw(c122.813,46.348) 122.813,46.123 123.975,46.123 134.432,46.123 136.614,48.305 151.398,48.305 154.978,51.886 154.978,52.993 160.064,58.079 162.145,58.079 165.931,61.865 168.089,61.865 v1(168.275,62.052)
ADC_SCK_P: IC4.6 IC36.41 R79.2 | length 90.7
  L1 w0.127: IC36.41@106.864,41.34 106.864,41.942 106.766,42.039 106.766,42.161 107.608,43.003 107.847,43.003 108.19,42.66 R79.2@108.694,42.66 109.08,42.66 109.237,42.817 v1(109.444,42.817) ; v1(168.275,61.425) 168.475,61.625 176.538,61.625 179.876,58.288 180.756,58.288 180.828,58.215 181.316,58.215 IC4.6@181.367,58.164
  L4 w0.127: v1(109.444,42.817) 109.506,42.817 109.664,42.975 111.224,42.975 111.914,42.975 112.009,42.881 112.009,42.776 112.103,42.682 112.541,42.682 112.636,42.776 112.636,42.885 112.923,43.173 113.272,43.173 114.886,43.173 117.582,45.869 117.775,45.869 117.966,45.869 ccw(c117.966,46.348) 118.445,46.348 118.445,47.301 cw(c118.67,47.301) 118.67,47.527 119.347,47.527 cw(c119.347,47.301) 119.572,47.301 119.572,46.238 ccw(c120.051,46.238) 120.051,45.759 120.728,45.759 ccw(c120.728,46.238) 121.207,46.238 121.207,46.648 cw(c121.432,46.648) 121.432,46.873 122.109,46.873 cw(c122.109,46.648) 122.334,46.648 122.334,46.348 ccw(c122.813,46.348) 122.813,45.869 123.975,45.869 134.537,45.869 136.719,48.051 151.503,48.051 151.578,48.126 155.232,51.78 155.232,52.888 160.17,57.825 162.25,57.825 166.037,61.611 168.089,61.611 v1(168.275,61.425)
ADC_SDOA_N: IC5.1 IC14.1 IC36.28 R21.1 | length 94.2
  L1 w0.127: IC36.28@107.539,34.665 107.965,34.665 108.063,34.568 108.572,34.568 109.286,33.853 111.294,33.853 111.719,34.279 111.719,34.68 111.558,34.841 v1(111.558,34.879) ; v1(158.722,52.135) 158.904,52.317 159.084,52.317 R21.1@159.427,51.974 ; R21.1@159.447,51.974 159.674,52.2 159.674,52.243 159.748,52.317 160.339,52.317 160.478,52.179 IC14.1@160.478,50.894 ; v1(164.222,49.135) 164.404,49.317 165.839,49.317 165.978,49.179 IC5.1@165.978,47.894
  L4 w0.127: v1(111.558,34.879) 111.558,34.804 111.744,34.618 111.744,34.249 112.159,33.834 113.499,33.834 115.65,35.985 115.65,37.49 119.618,41.458 122.484,41.458 124.056,41.458 cw(c124.056,41.232) 124.281,41.232 124.281,41.216 ccw(c124.76,41.216) 124.76,40.737 125.437,40.737 ccw(c125.437,41.216) 125.916,41.216 125.916,41.561 cw(c126.141,41.561) 126.141,41.786 126.818,41.786 cw(c126.818,41.561) 127.043,41.561 127.043,41.216 ccw(c127.522,41.216) 127.522,40.737 128.199,40.737 ccw(c128.199,41.216) 128.678,41.216 128.678,41.561 cw(c128.903,41.561) 128.903,41.786 129.58,41.786 cw(c129.58,41.561) 129.805,41.561 129.805,41.216 ccw(c130.284,41.216) 130.284,40.737 130.961,40.737 ccw(c130.961,41.216) 131.44,41.216 131.44,41.561 cw(c131.665,41.561) 131.665,41.786 132.342,41.786 cw(c132.342,41.561) 132.567,41.561 132.567,41.216 ccw(c133.046,41.216) 133.046,40.737 133.723,40.737 ccw(c133.723,41.216) 134.202,41.216 134.202,41.561 cw(c134.427,41.561) 134.427,41.786 135.104,41.786 cw(c135.104,41.561) 135.329,41.561 135.329,41.216 ccw(c135.808,41.216) 135.808,40.737 136.485,40.737 ccw(c136.485,41.216) 136.964,41.216 136.964,41.561 cw(c137.189,41.561) 137.189,41.786 137.866,41.786 cw(c137.866,41.561) 138.091,41.561 138.091,38.47 ccw(c138.57,38.47) 138.57,37.991 139.247,37.991 ccw(c139.247,38.47) 139.726,38.47 139.726,41.561 cw(c139.951,41.561) 139.951,41.786 140.628,41.786 cw(c140.628,41.561) 140.853,41.561 140.853,39.808 ccw(c141.332,39.808) 141.332,39.329 142.009,39.329 ccw(c142.009,39.808) 142.488,39.808 142.488,41.232 cw(c142.713,41.232) 142.713,41.458 143.685,41.458 143.783,41.458 147.375,45.05 151.9,45.05 157.506,50.656 157.506,51.843 157.982,52.319 158.461,52.319 158.645,52.135 v1(158.722,52.135) 158.799,52.135 158.983,52.319 159.393,52.319 162.392,49.319 163.961,49.319 164.145,49.135 v1(164.222,49.135)
ADC_SDOA_P: IC5.8 IC14.8 IC36.27 R21.2 | length 94.3
  L1 w0.127: IC36.27@107.539,34.165 107.965,34.165 108.063,34.263 108.445,34.263 109.16,33.549 111.42,33.549 112.024,34.153 112.024,34.68 112.185,34.841 v1(112.185,34.879) ; v1(158.722,52.762) 158.913,52.571 159.084,52.571 R21.2@159.427,52.914 ; R21.2@159.447,52.914 159.674,52.687 159.674,52.645 159.748,52.571 160.344,52.571 160.478,52.705 IC14.8@160.478,53.994 ; v1(164.222,49.762) 164.413,49.571 165.844,49.571 165.978,49.705 IC5.8@165.978,50.994
  L4 w0.127: v1(112.185,34.879) 112.185,34.804 111.998,34.618 111.998,34.354 112.264,34.088 113.394,34.088 115.396,36.09 115.396,37.595 119.513,41.712 122.484,41.712 124.056,41.712 cw(c124.056,41.232) 124.535,41.232 124.535,41.216 ccw(c124.76,41.216) 124.76,40.991 125.437,40.991 ccw(c125.437,41.216) 125.662,41.216 125.662,41.561 cw(c126.141,41.561) 126.141,42.04 126.818,42.04 cw(c126.818,41.561) 127.297,41.561 127.297,41.216 ccw(c127.522,41.216) 127.522,40.991 128.199,40.991 ccw(c128.199,41.216) 128.424,41.216 128.424,41.561 cw(c128.903,41.561) 128.903,42.04 129.58,42.04 cw(c129.58,41.561) 130.059,41.561 130.059,41.216 ccw(c130.284,41.216) 130.284,40.991 130.961,40.991 ccw(c130.961,41.216) 131.186,41.216 131.186,41.561 cw(c131.665,41.561) 131.665,42.04 132.342,42.04 cw(c132.342,41.561) 132.821,41.561 132.821,41.216 ccw(c133.046,41.216) 133.046,40.991 133.723,40.991 ccw(c133.723,41.216) 133.948,41.216 133.948,41.561 cw(c134.427,41.561) 134.427,42.04 135.104,42.04 cw(c135.104,41.561) 135.583,41.561 135.583,41.216 ccw(c135.808,41.216) 135.808,40.991 136.485,40.991 ccw(c136.485,41.216) 136.71,41.216 136.71,41.561 cw(c137.189,41.561) 137.189,42.04 137.866,42.04 cw(c137.866,41.561) 138.345,41.561 138.345,38.47 ccw(c138.57,38.47) 138.57,38.245 139.247,38.245 ccw(c139.247,38.47) 139.472,38.47 139.472,41.561 cw(c139.951,41.561) 139.951,42.04 140.628,42.04 cw(c140.628,41.561) 141.107,41.561 141.107,39.808 ccw(c141.332,39.808) 141.332,39.583 142.009,39.583 ccw(c142.009,39.808) 142.234,39.808 142.234,41.232 cw(c142.713,41.232) 142.713,41.712 143.678,41.712 143.685,41.719 147.27,45.304 151.795,45.304 157.252,50.761 157.252,51.949 157.877,52.573 158.456,52.573 158.645,52.762 v1(158.722,52.762) 158.799,52.762 158.988,52.573 159.498,52.573 162.498,49.573 163.956,49.573 164.145,49.762 v1(164.222,49.762)
ADC_SDOB_N: IC15.8 IC36.30 R22.2 | length 91.1
  L1 w0.127: IC36.30@107.539,35.665 108.468,35.665 108.424,35.709 v1(108.424,35.757) ; v1(158.722,45.262) 158.913,45.071 159.084,45.071 R22.2@159.427,45.414 ; R22.2@159.447,45.414 159.673,45.188 159.673,45.146 159.748,45.071 160.344,45.071 160.477,45.205 IC15.8@160.477,46.494
  L4 w0.127: v1(108.424,35.757) 108.631,35.55 109.049,35.55 109.329,35.27 109.329,33.459 111.509,31.279 121.305,31.279 122.969,29.615 124.45,29.615 124.641,29.615 ccw(c124.641,29.841) 124.866,29.841 124.866,32.105 cw(c125.345,32.105) 125.345,32.584 126.022,32.584 cw(c126.022,32.105) 126.501,32.105 126.501,29.662 ccw(c126.726,29.662) 126.726,29.436 127.403,29.436 ccw(c127.403,29.662) 127.628,29.662 127.628,32.105 cw(c128.107,32.105) 128.107,32.584 128.784,32.584 cw(c128.784,32.105) 129.263,32.105 129.263,29.841 ccw(c129.488,29.841) 129.488,29.615 130.15,29.615 132.945,29.615 133.136,29.615 ccw(c133.136,29.841) 133.361,29.841 133.361,31.783 cw(c133.84,31.783) 133.84,32.262 134.517,32.262 cw(c134.517,31.783) 134.996,31.783 134.996,29.562 ccw(c135.221,29.562) 135.221,29.336 135.898,29.336 ccw(c135.898,29.562) 136.123,29.562 136.123,31.783 cw(c136.602,31.783) 136.602,32.262 137.279,32.262 cw(c137.279,31.783) 137.758,31.783 137.758,29.562 ccw(c137.983,29.562) 137.983,29.336 138.66,29.336 ccw(c138.66,29.562) 138.885,29.562 138.885,31.783 cw(c139.364,31.783) 139.364,32.262 140.041,32.262 cw(c140.041,31.783) 140.52,31.783 140.52,29.841 ccw(c140.745,29.841) 140.745,29.615 142.331,29.615 142.725,30.01 157.788,45.073 158.455,45.073 158.645,45.262 v1(158.722,45.262)